# Altium PCB PCB_Macro-Pad_2_2026-10-21.pcbdoc
Units mil, origin at the board's own origin, x right, y up, seen from the top; angles counter-clockwise.
Board outline 5051.36 x 4100 mil, 2 copper layers (Top Layer, Bottom Layer); 20 components, 21 nets, 95 pads, 18 vias.
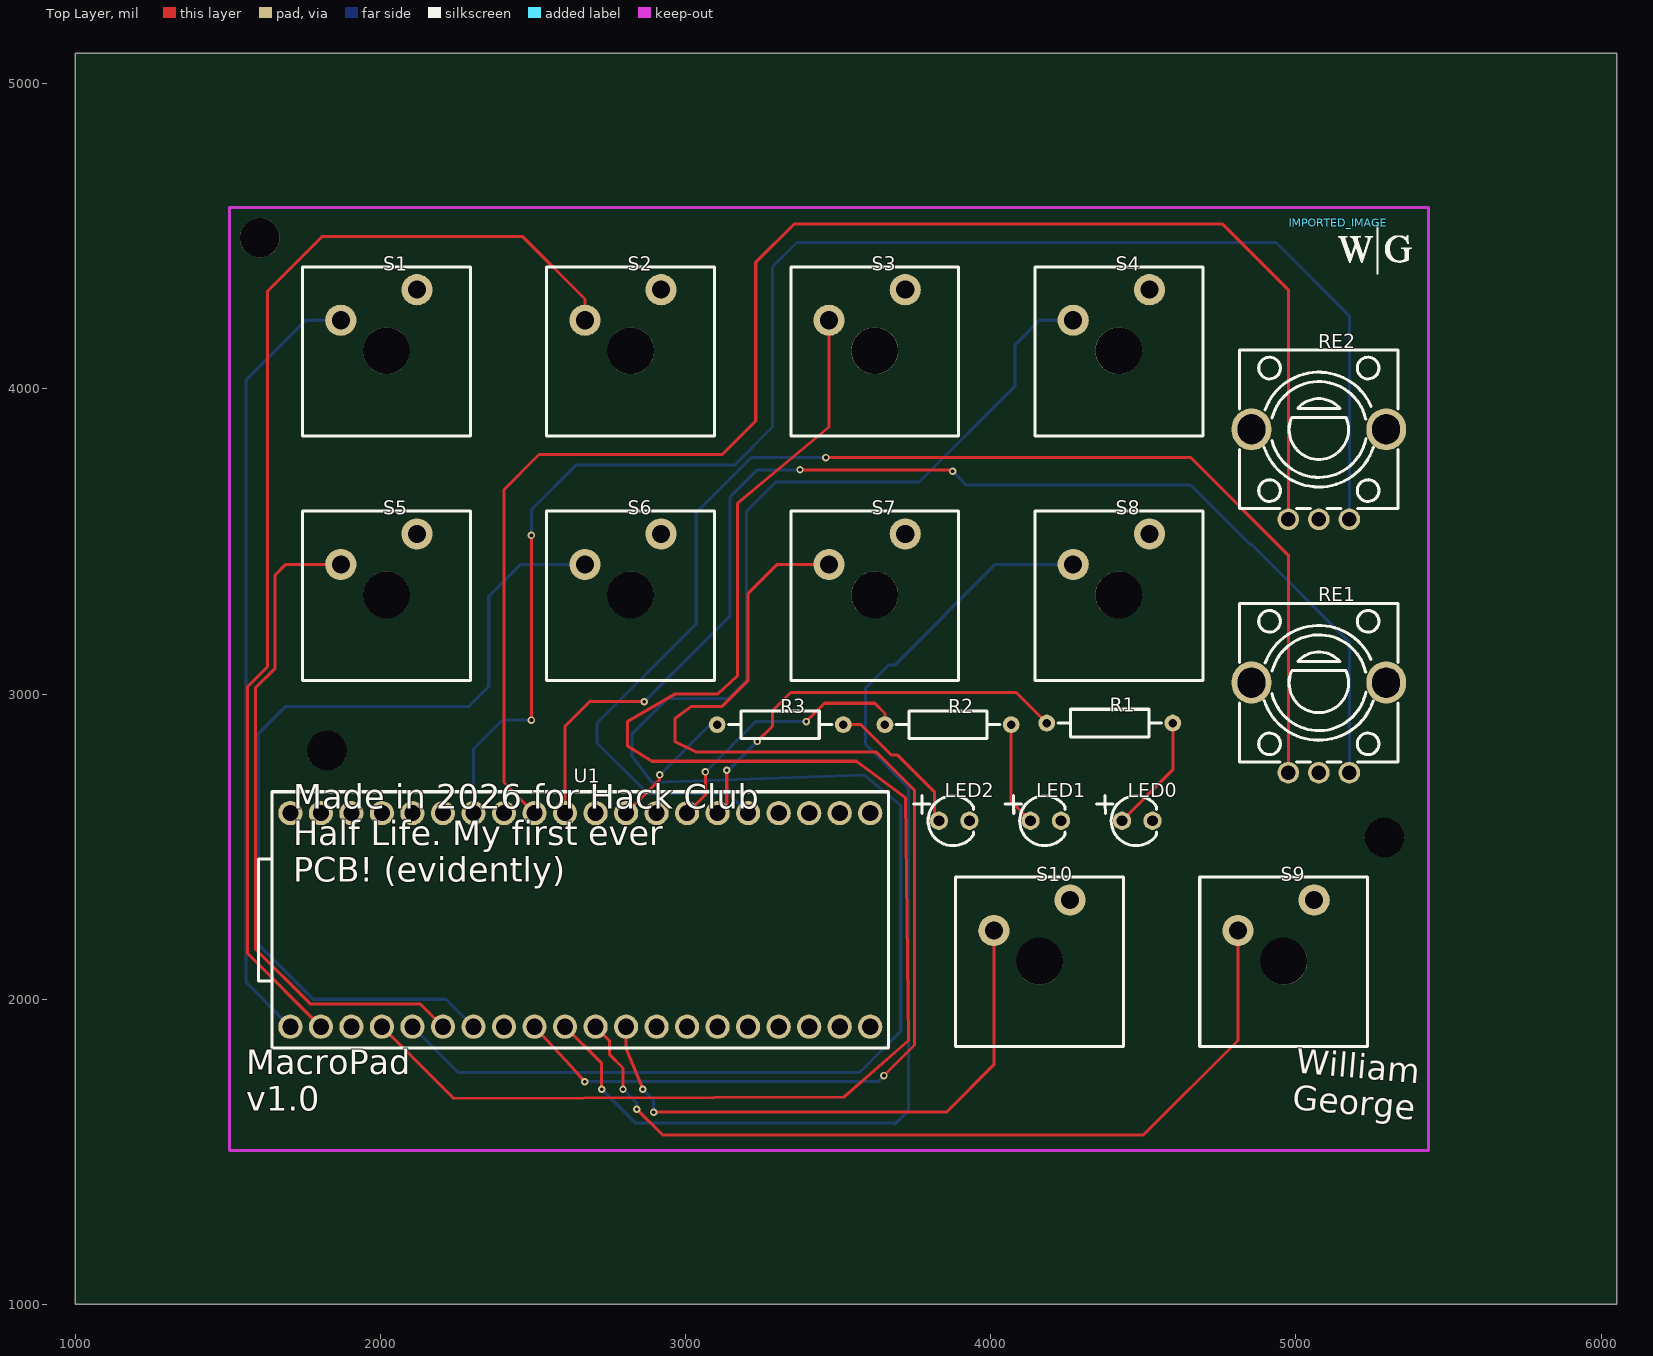
[diagram p0: Top Layer view]
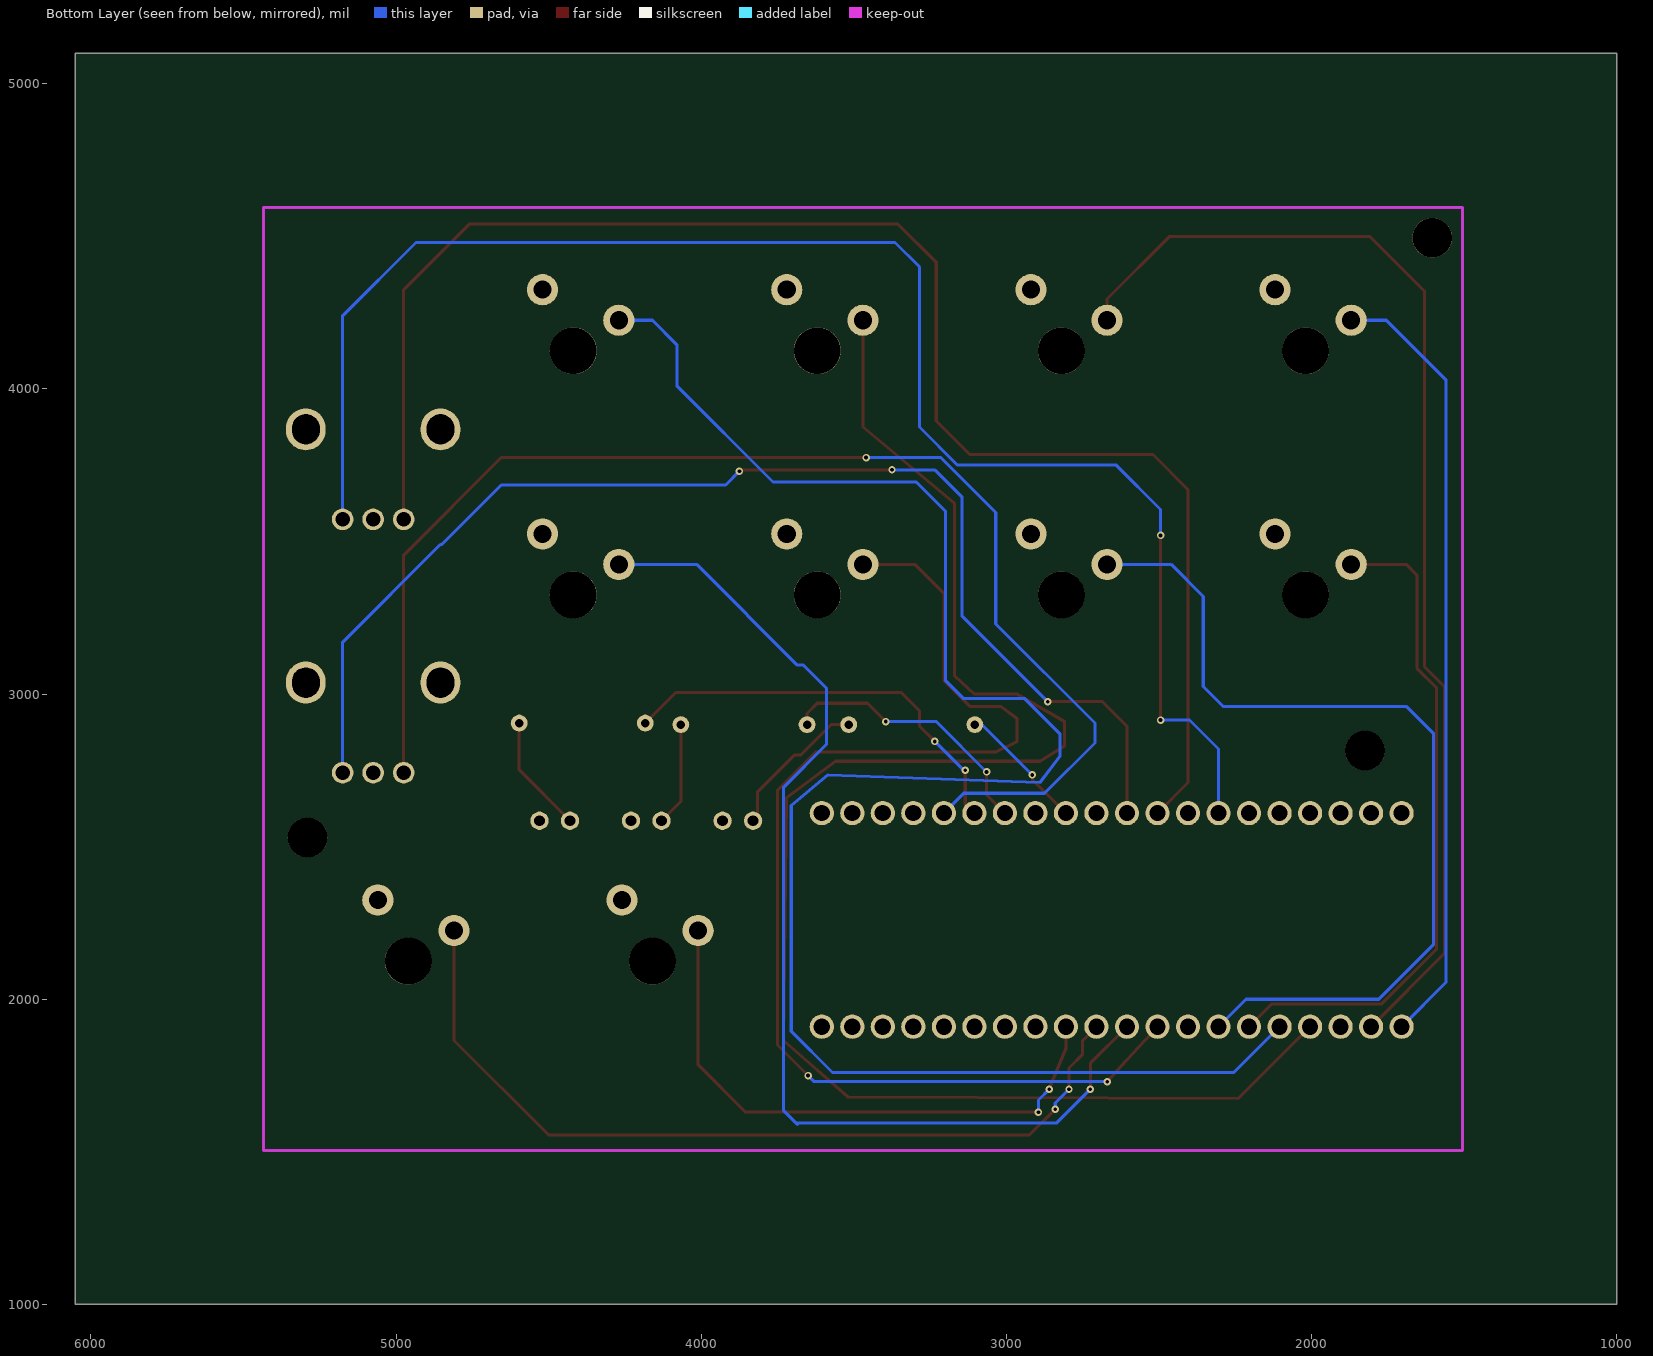
[diagram p1: Bottom Layer view, seen from below]

## Layer stack, top to bottom
Top Layer: signal copper (thickness not stored)
Dielectric: dielectric 12.6, FR-4, Dk 4.8
Bottom Layer: signal copper (thickness not stored)

## Board outline
6051.36,1000 1000,1000 1000,5100 6051.36,5100

## Components (designator, comment, footprint, x,y, rotation, side; value= is the part's Value field where it differs from the comment)
IMPORTED_IMAGE "IMPORTED_IMAGE" IMPORTED_IMAGE 5138.1,4545.15 r0 top
LED0 "TJ-L3FYTGHKMCGSFLC7K-A5" LED-TH_BD3.8-P2.54-FD 4480,2585 r0 top
LED1 "TJ-L3FYTGHKMCGSFLC7K-A5" LED-TH_BD3.8-P2.54-FD 4180,2585 r0 top
LED2 "TJ-L3FYTGHKMCGSFLC7K-A5" LED-TH_BD3.8-P2.54-FD 3880,2585 r0 top
R1 "330Ω" RES-TH_BD2.3-L6.5-P10.50-D0.5 4390,2905 r0 top
R2 "330Ω" RES-TH_BD2.3-L6.5-P10.50-D0.5 3860,2900 r0 top
R3 "330Ω" RES-TH_BD2.3-L6.5-P10.50-D0.5 3310,2900 r0 top
RE1 "EC12E24204A8" SW-TH_EC12EXXXX 5075,2890 r0 top
RE2 "EC12E24204A8" SW-TH_EC12EXXXX 5075,3720 r0 top
S1 "CPG151101D05" SW-TH_CPG151101D05 1995,4275 r0 top
S2 "CPG151101D05" SW-TH_CPG151101D05 2795,4275 r0 top
S3 "CPG151101D05" SW-TH_CPG151101D05 3595,4275 r0 top
S4 "CPG151101D05" SW-TH_CPG151101D05 4395,4275 r0 top
S5 "CPG151101D05" SW-TH_CPG151101D05 1995,3475 r0 top
S6 "CPG151101D05" SW-TH_CPG151101D05 2795,3475 r0 top
S7 "CPG151101D05" SW-TH_CPG151101D05 3595,3475 r0 top
S8 "CPG151101D05" SW-TH_CPG151101D05 4395,3475 r0 top
S9 "CPG151101D05" SW-TH_CPG151101D05 4935,2275 r0 top
S10 "CPG151101D05" SW-TH_CPG151101D05 4135,2275 r0 top
U1 "PICO" COMM-TH_RP2040_PI_PICO 2655,2260 r0 top

## Footprints (in the part's own frame and the unit in brackets; to place one, negate y for a bottom-side part, rotate by r counter-clockwise, add the part's x,y. Pads: shape width x height; smd on the part's side, far side on the other; paste and mask are expansions set on the pad)
COMM-TH_RP2040_PI_PICO [mm]
  round 2.015 hole 1.35 paste+0 mask+0.051: 1(-24.13,-8.89) 2(-21.59,-8.89) 3(-19.05,-8.89) 4(-16.51,-8.89) 5(-13.97,-8.89) 6(-11.43,-8.89) 7(-8.89,-8.89) 8(-6.35,-8.89) 9(-3.81,-8.89) 10(-1.27,-8.89) 11(1.27,-8.89) 12(3.81,-8.89) 13(6.35,-8.89) 14(8.89,-8.89) 15(11.43,-8.89) 16(13.97,-8.89) 17(16.51,-8.89) 18(19.05,-8.89) 19(21.59,-8.89) 20(24.13,-8.89) 21(24.13,8.89) 22(21.59,8.89) 23(19.05,8.89) 24(16.51,8.89) 25(13.97,8.89) 26(11.43,8.89) 27(8.89,8.89) 28(6.35,8.89) 29(3.81,8.89) 30(1.27,8.89) 31(-1.27,8.89) 32(-3.81,8.89) 33(-6.35,8.89) 34(-8.89,8.89) 35(-11.43,8.89) 36(-13.97,8.89) 37(-16.51,8.89) 38(-19.05,8.89) 39(-21.59,8.89) 40(-24.13,8.89)
  silkscreen extent -26.8,-10.67 25.65,10.67
IMPORTED_IMAGE [mil]
  silkscreen extent 0,-170 241,0
LED-TH_BD3.8-P2.54-FD [mil]
  round 60 hole 35.43 paste+0 mask+2: 1(-50,0) 2(50,0)
  silkscreen extent -134,-82 63,83
RES-TH_BD2.3-L6.5-P10.50-D0.5 [mm]
  round 1.4 hole 0.7 paste+0 mask+0.051: 1(-5.25,0) 2(5.25,0)
  silkscreen extent -4.32,-1.15 4.32,1.15
SW-TH_CPG151101D05 [mm]
  round 2.6 hole 1.5 paste+0 mask+0.051: 1(-3.17,-1.27) 2(3.17,1.27)
  round 3.9 hole 3.9 unplated paste+0: ""(0.63,-3.81)
  silkscreen extent -6.35,-10.92 7.62,3.17
SW-TH_EC12EXXXX [mm]
  round 1.8 hole 1.2 paste+0 mask+0.051: A(-2.54,-3.75) B(2.54,-3.75) C(0,-3.75)
  oval 3.3x3.5 hole 2.3 slot 2.5 at 90 deg paste+0 mask+0.051: D(5.6,3.75) E(-5.6,3.75)
  silkscreen extent -6.6,-2.85 6.6,10.35

## Free pads (board coordinates)
  round 129.92 hole 129.92 unplated paste+0: ""(1605,4495) ""(1825,2815) ""(5290,2530)

## Via types
v1: diameter 24.41, hole 12.2, Top Layer to Bottom Layer, tented both sides, 18 vias

## Nets (pads, with @x,y where several pads share a name; then routed paths per layer and width w, separated by ;. In a path a pad name is that pad's centre, name@x,y a point inside that pad or via, vN(x,y) a via of type N, cw(c..) or ccw(c..) an arc to the next point about the centre after c; other vN are vias at no path point)
1A: RE1.A U1.25 | length 4339.6
  Top Layer w10: v1(3460,3775) 4655,3775 4975,3455 RE1.A
  Bottom Layer w10: U1.25 3140,2675 2875,2675 2710,2840 2710,2905 3035,3230 3035,3595 3215,3775 v1(3460,3775)
1B: RE1.B U1.31 | length 4093.1
  Top Layer w10: U1.31 2605,2895 2685,2975 v1(2865,2975) ; v1(3375,3735) 3870,3735 v1(3875,3730)
  Bottom Layer w10: v1(2865,2975) 3145,3255 3145,3645 3235,3735 v1(3375,3735) ; v1(3875,3730) 3920,3685 4655,3685 4850,3490 4855,3490 5175,3170 RE1.B
2A: RE2.A U1.32 | length 5178.1
  Top Layer w10: U1.32 2405,2710 2405,3670 2520,3785 3120,3785 3230,3895 3230,4415 3355,4540 4760,4540 4975,4325 RE2.A
2B: RE2.B U1.34 | length 5246.4
  Top Layer w10: v1(2495,2915) v1(2495,3520)
  Bottom Layer w10: U1.34 2305,2820 2400,2915 v1(2495,2915) ; v1(2495,3520) 2495,3605 2640,3750 3160,3750 3285,3875 3285,4400 3365,4480 4935,4480 5175,4240 RE2.B
GND: LED0.2 LED1.2 LED2.2 RE1.C RE1.D RE1.E RE2.C RE2.D RE2.E S1.2 S2.2 S3.2 S4.2 S5.2 S6.2 S7.2 S8.2 S9.2 S10.2 U1.3 U1.8 U1.13 U1.18 U1.23 U1.28 U1.33 U1.38
K1: S1.1 U1.1 | length 2571
  Bottom Layer w10: U1.1 1560,2055 1560,4030 1755,4225 S1.1
K2: S2.1 U1.2 | length 3805.9
  Top Layer w10: U1.2 1565,2150 1565,3025 1630,3090 1630,4320 1810,4500 2465,4500 2670.2,4294.8 S2.1
K3: S3.1 U1.4 | length 5444.9
  Top Layer w10: U1.4 2240,1675 3520,1680 3730,1865 3720,2660 3560,2780 2890,2780 2810,2830 2810,2910 2965,3000 3105,3000 3170,3060 3170,3625 3470.2,3875.2 S3.1
K4: S4.1 U1.5 | length 5902.4
  Bottom Layer w10: U1.5 2255,1760 3570,1760 3705,1895 3705,2635 3585,2735 2890,2710 2825,2795 2825,2870 2940,2985 3140,2985 3200,3045 3200,3600 3295,3695 3765,3695 4080,4010 4080,4145 4160,4225 S4.1
K5: S5.1 U1.6 | length 2202.2
  Top Layer w10: S5.1 1690,3425 1655,3390 1655,3085 1590,3020 1590,2165 1770,1985 2130,1985 U1.6
K6: S6.1 U1.7 | length 2979.7
  Bottom Layer w10: U1.7 2215,2000 1780,2000 1600,2180 1600,2870 1690,2960 2290,2960 2355,3025 2355,3320 2460,3425 S6.1
K7: S7.1 U1.9 | length 4006.7
  Top Layer w10: U1.9 2625,1780 v1(2670,1730) ; S7.1 3300,3425 3205,3330 3205,3045 3120,2960 3020,2960 2965,2920 2965,2845 3035,2810 3625,2810 3750,2685 3750,1850 v1(3650,1750)
  Bottom Layer w10: v1(2670,1730) 3630,1730 v1(3650,1750)
K8: S8.1 U1.10 | length 3619.9
  Top Layer w10: U1.10 2725,1790 v1(2725,1705)
  Bottom Layer w10: v1(2725,1705) 2835,1595 3685,1595 3685,1590 3730,1635 3730,2695 3590,2835 3590,3020 3665,3095 3685,3095 4015,3425 S8.1
K9: S9.1 U1.11 | length 2819.6
  Top Layer w10: U1.11 2750,1865 2750,1820 2795,1775 v1(2795,1705) ; v1(2840,1640) 2925,1555 4500,1555 4810.2,1865.2 S9.1
  Bottom Layer w10: v1(2795,1705) 2840,1660 v1(2840,1640)
K10: S10.1 U1.12 | length 1924.6
  Top Layer w10: U1.12 2805,1840 v1(2860,1705) ; v1(2895,1630) 3855,1630 4010.2,1785.2 S10.1
  Bottom Layer w10: v1(2860,1705) 2895,1670 v1(2895,1630)
LED0: R1.1 U1.26 | length 1377.1
  Top Layer w10: U1.26 3135,2640 v1(3135,2750) ; v1(3235,2845) 3285,2895 3285,2945 3345,3005 4083.31,3005 R1.1
  Bottom Layer w10: v1(3135,2750) 3140,2750 v1(3235,2845)
LED0_1: LED0.1 R1.2 | length 389
  Top Layer w10: LED0.1 4596.69,2751.69 R1.2
LED1: R2.1 U1.27 | length 891.8
  Top Layer w10: U1.27 3065,2670 v1(3065,2745) ; v1(3395,2910) 3455,2970 3620,2970 3653.3,2936.7 R2.1
  Bottom Layer w10: v1(3065,2745) 3230,2910 v1(3395,2910)
LED1_1: LED1.1 R2.2 | length 341.2
  Top Layer w10: R2.2 4066.69,2648.31 LED1.1
LED2: R3.1 U1.29 | length 427.2
  Top Layer w10: U1.29 2915,2720 v1(2915,2735)
  Bottom Layer w10: v1(2915,2735) 3080,2900 R3.1
LED2_1: LED2.1 R3.2 | length 490.7
  Top Layer w10: R3.2 3575,2900 3675,2800 3695,2800 3815,2680 3815,2600 LED2.1
pads on no net: S1. S2. S3. S4. S5. S6. S7. S8. S9. S10. U1.14 U1.15 U1.16 U1.17 U1.19 U1.20 U1.21 U1.22 U1.24 U1.30 U1.35 U1.36 U1.37 U1.39 U1.40

## Polygon pours and split planes (outlines as drawn)
GND on Bottom Layer (solid): 1505,4595 5435,4595 5435,1505 1505,1505

## Silkscreen, mask and mechanical layers (free items; w line width, h text height)
Top Overlay:
  text "Made in 2026 for Hack Club  / Half Life. My first ever / PCB! (evidently)" at 1715,2385 h80
  text "William / George" at 4986.51,1640.15 h80 r355
  text "MacroPad / v1.0" at 1560,1635 h80